# Altium PCB FG23_diff_PA_match_PCB.PcbDoc (part 1 of 2)
Units mil, origin at the board's own origin, x right, y up, seen from the top; angles counter-clockwise.
Board outline 1181.1 x 1771.65 mil, 4 copper layers (Top Layer, Signal Layer 2, Signal Layer 3, Bottom Layer), stack 62.992 mil thick; 85 components, 79 nets, 311 pads, 463 vias.
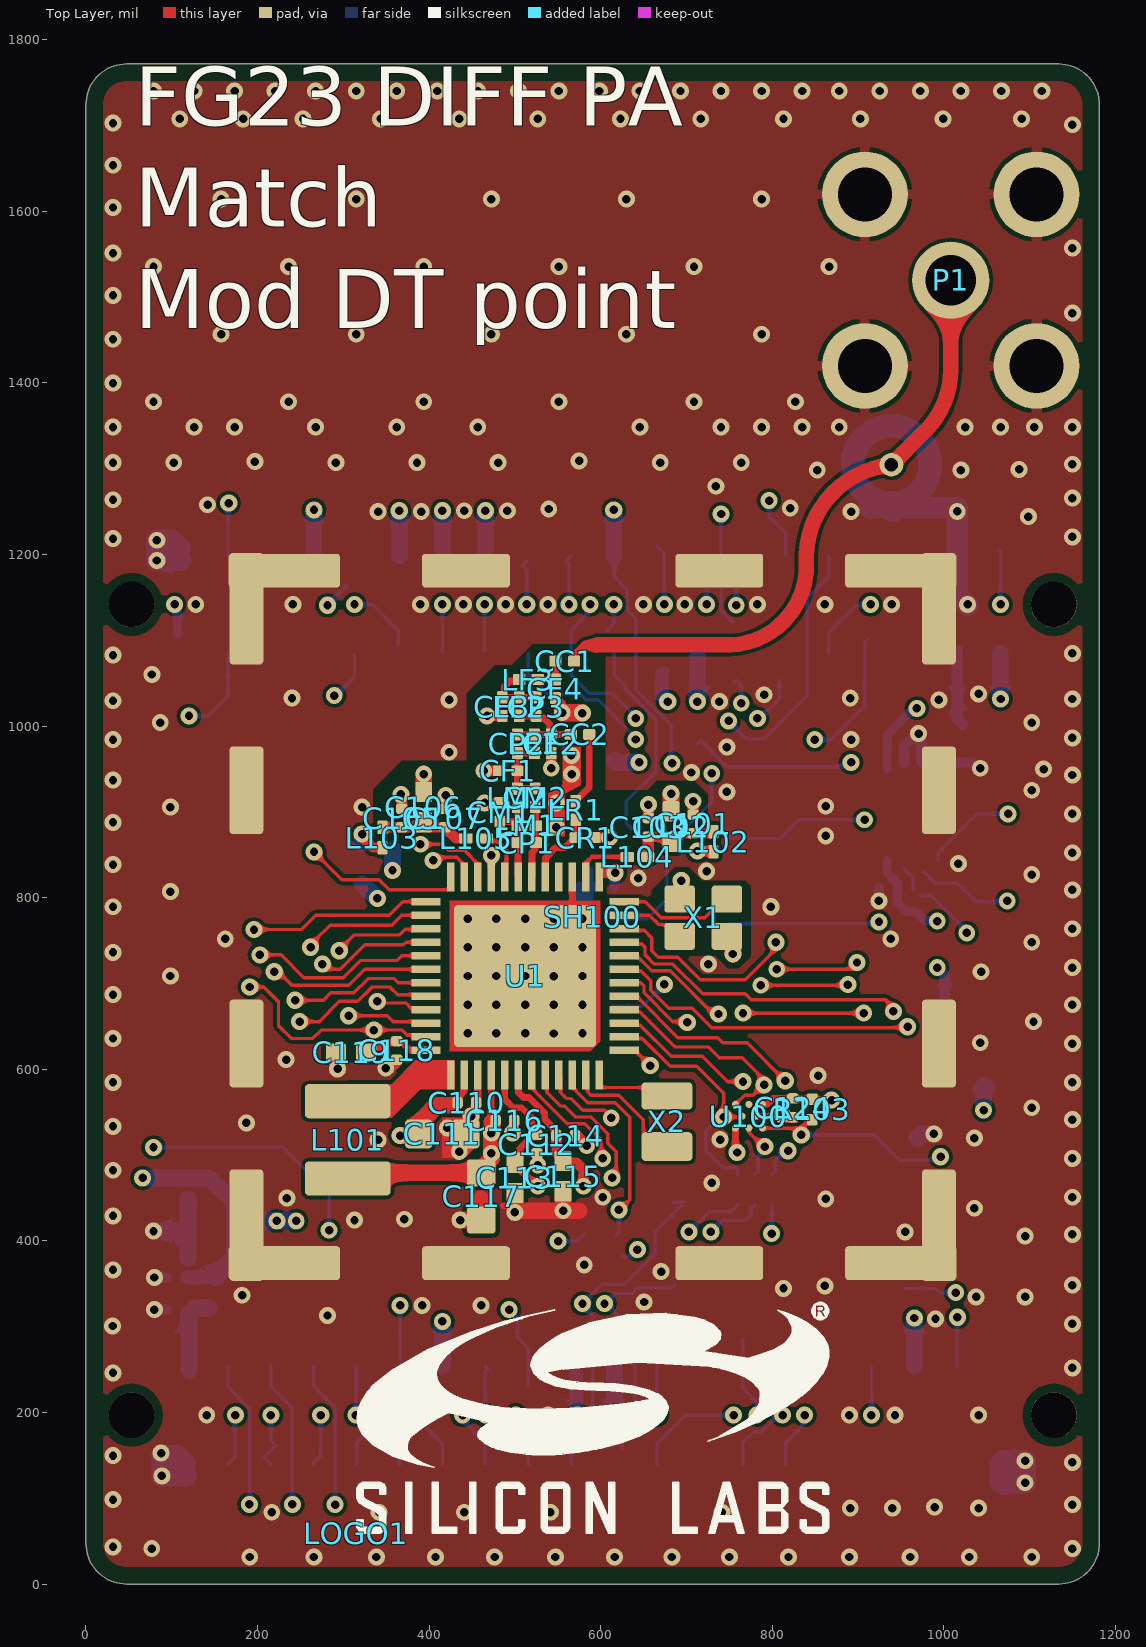
[diagram p0: Top Layer view]
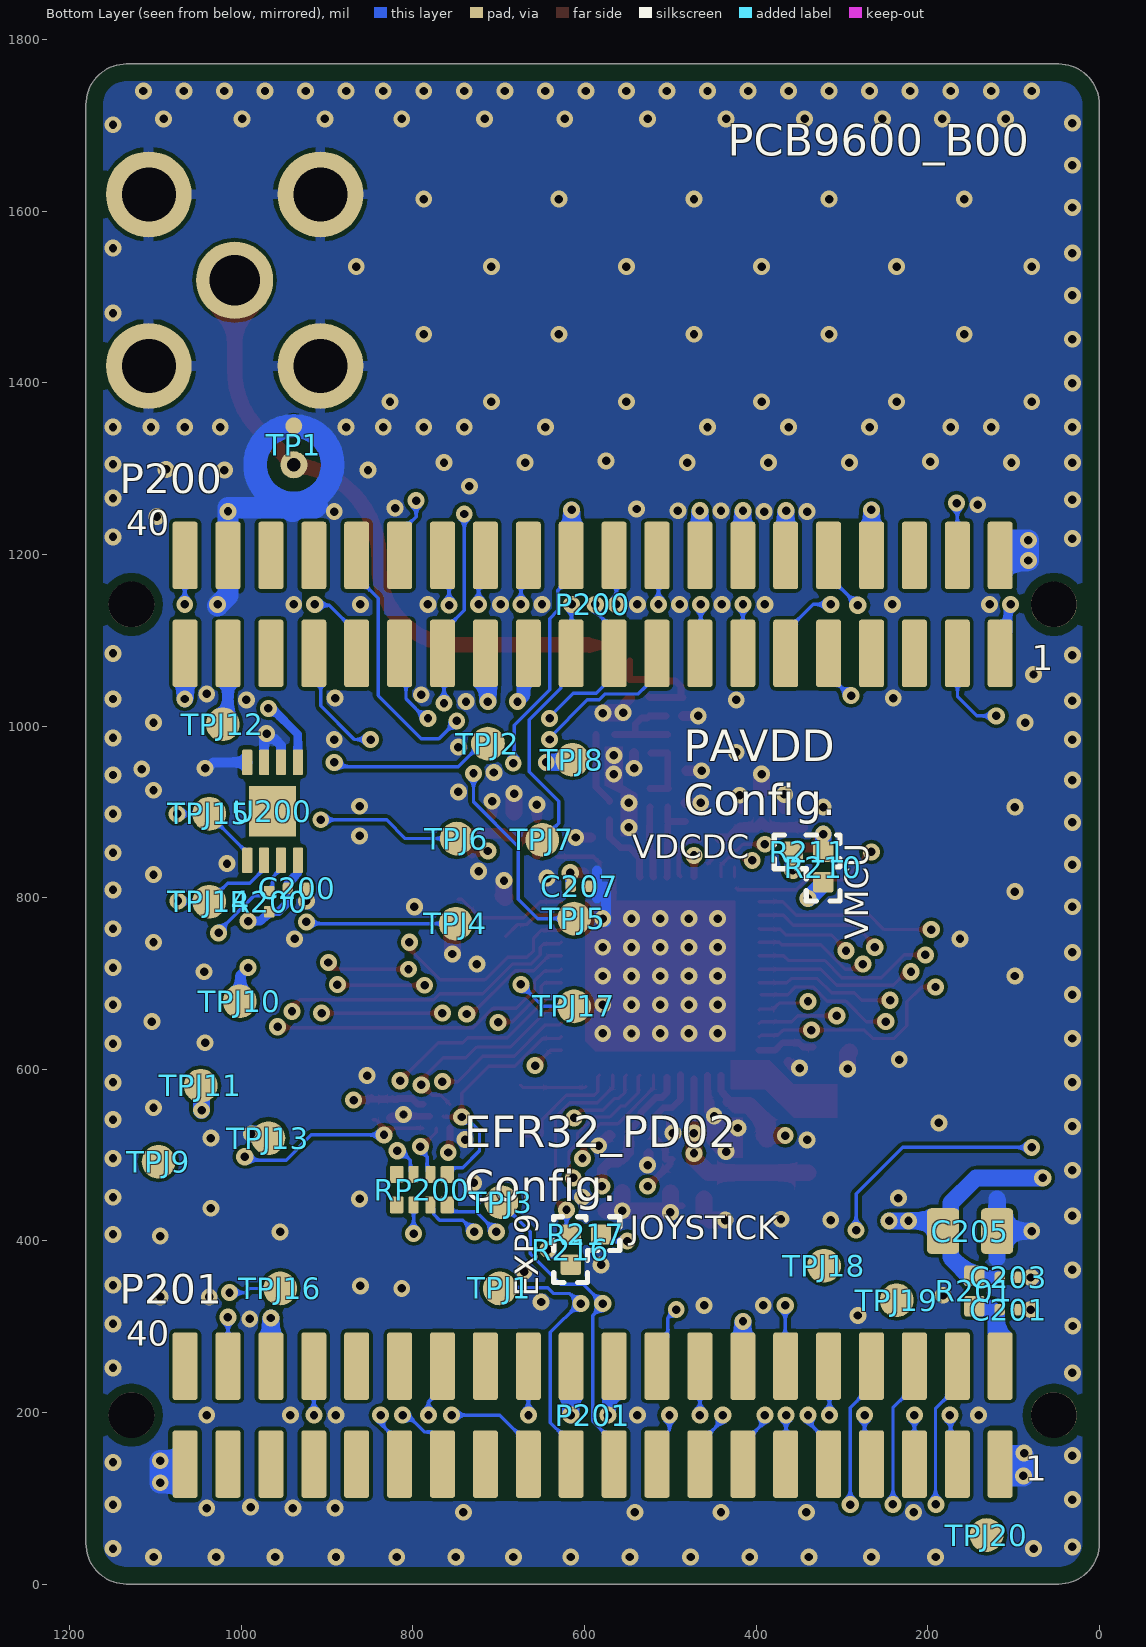
[diagram p1: Bottom Layer view, seen from below]
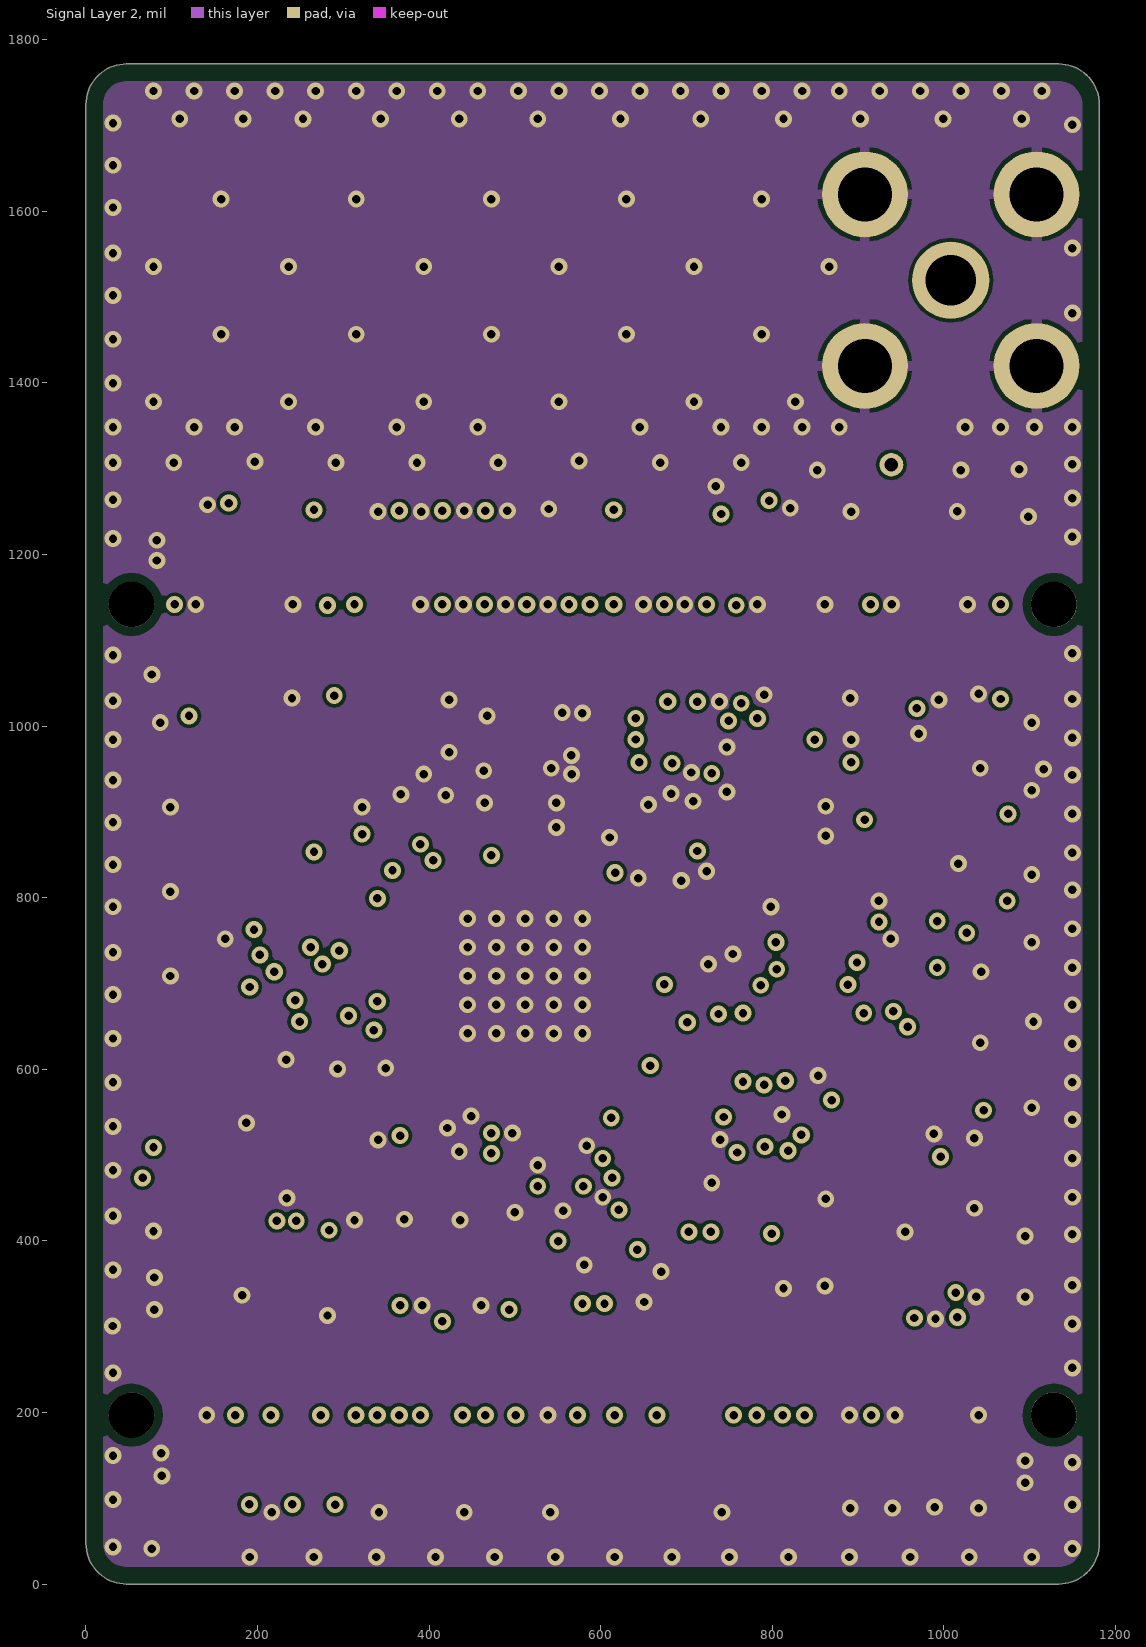
[diagram p2: Signal Layer 2]
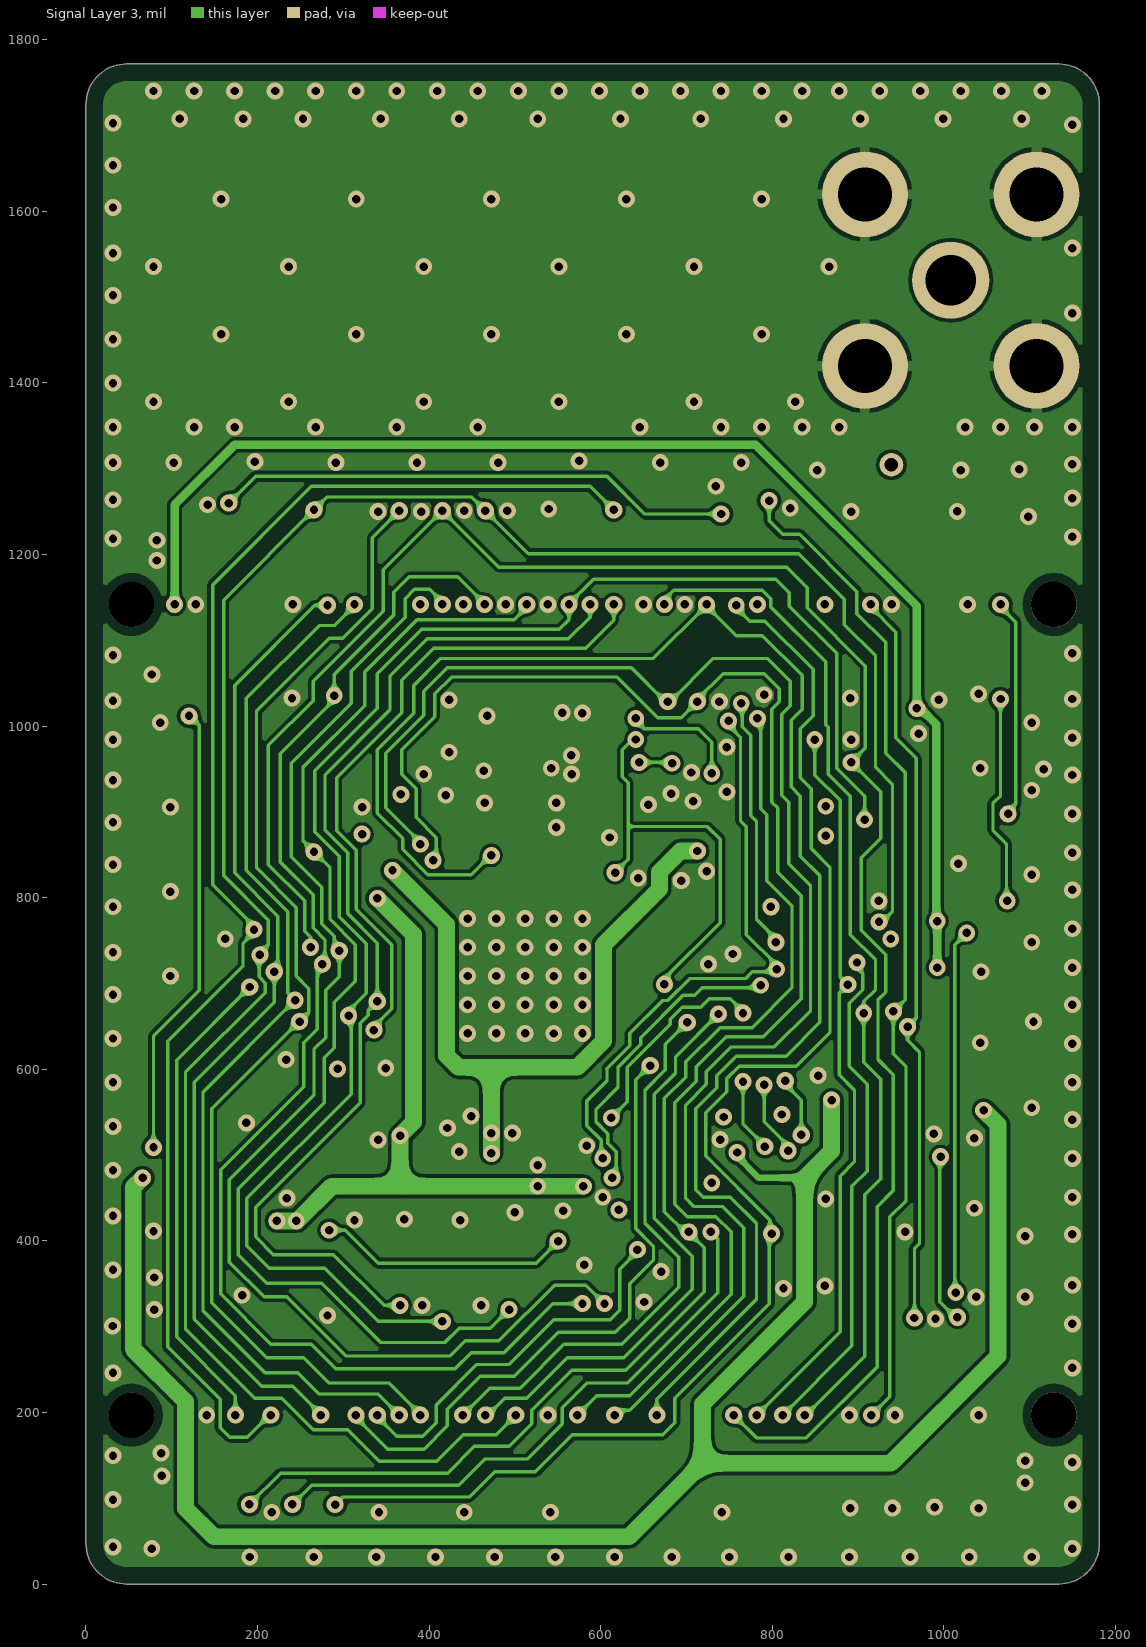
[diagram p3: Signal Layer 3]

## Layer stack, top to bottom
Top Solder: solder mask 0.4, Solder Resist, Dk 3.5
Top Layer: signal copper 1.378
Dielectric 1: core 12.7953, FR-4, Dk 4.2
Signal Layer 2: signal copper 0.7087
Dielectric 3: prepreg 33.2283, Dk 4.2
Signal Layer 3: signal copper 0.7087
Dielectric 2: core 12.7953, Dk 4.2
Bottom Layer: signal copper 1.378
Bottom Solder: solder mask 0.4, Solder Resist, Dk 3.5

## Board outline
0,47.24 0,1724.41 cw(c47.24,1724.41) 47.24,1771.65 1133.86,1771.65 cw(c1133.86,1724.41) 1181.1,1724.41 1181.1,47.24 cw(c1133.86,47.24) 1133.86,0 47.24,0 cw(c47.24,47.24)

## Design rules (kind name [scope] priority, off if disabled: settings)
AcuteAngle [All] p1: minimum=7.00000000000000E+0001 checktracksonly=FALSE
BoardOutlineClearance [All] p1: gap=19.68 ignorepadtopadclearanceinfootprint=FALSE
Clearance Clearance_50Ohm [InNet('50R*') vs InNet('GND')] p1: gap=10 ignorepadtopadclearanceinfootprint=FALSE except(0: Arc-Hole Track-Hole SMDPad-Hole THPad-Hole Via-Hole Fill-Hole Poly-Hole Region-Hole Text-Hole; 5.91: Track-SMDPad; 7.87: SMDPad-SMDPad)
Clearance Clearance_to_Holes [InPadClass('NPTH')] p2: gap=10 ignorepadtopadclearanceinfootprint=FALSE except(0: Arc-Hole Track-Hole SMDPad-Hole THPad-Hole Via-Hole Fill-Hole Poly-Hole Region-Hole Text-Hole)
Clearance Clerance_Polygon [InPolygon] p3: gap=3.94 ignorepadtopadclearanceinfootprint=FALSE except(0: Arc-Hole Track-Hole SMDPad-Hole THPad-Hole Via-Hole Fill-Hole Poly-Hole Region-Hole Text-Hole)
Clearance Clearance_General [All] p4: gap=3.94 ignorepadtopadclearanceinfootprint=FALSE except(0: Arc-Hole Track-Hole SMDPad-Hole THPad-Hole Via-Hole Fill-Hole Poly-Hole Region-Hole Text-Hole)
HoleToHoleClearance HoleToHoleClearance_ANT1toPAD [Incomponent ('ANT1') vs ISpad] p1: gap=0 allowstackedmicrovias=TRUE
HoleToHoleClearance HoleToHoleClearance_R1toR2_1 [Incomponent ('R1') vs Incomponent ('R2')] p2: gap=0 allowstackedmicrovias=TRUE
HoleToHoleClearance HoleToHoleClearance_U1toVIA_1 [InComponent ('U1') vs IsVia] p3: gap=0 allowstackedmicrovias=TRUE
HoleToHoleClearance [All] p4: gap=10 allowstackedmicrovias=TRUE
MinimumSolderMaskSliver [All] p1: minsoldermaskwidth=2.95
PolygonConnect Polygon_VIA_Connect [IsVia] p1: connectstyle=Direct reliefconductorwidth=10 reliefentries=4 polygonreliefangle="90 Angle" airgapwidth=10
PolygonConnect PolygonConnect_SH100 [InComponent('SH100')] p2: connectstyle=Direct reliefconductorwidth=10 reliefentries=4 polygonreliefangle="90 Angle" airgapwidth=5
PolygonConnect PolygonConnect_P1 [InComponent('P1')] p3: connectstyle=Relief reliefconductorwidth=11.81 reliefentries=4 polygonreliefangle="90 Angle" airgapwidth=5
PolygonConnect [All] p4: connectstyle=NoConnect reliefconductorwidth=7.87 reliefentries=4 polygonreliefangle="90 Angle" airgapwidth=4.92
RoutingVias [All] p1: holewidth=11.81 width=25.59 viastyle="Through Hole" minholewidth=9.84 minwidth=19.68 maxholewidth=39.37 maxwidth=59.06
ShortCircuit ShortCircuit_ANTtoPAD [InNet('NetAT1_1') vs InNet('GND')] p1: allowed=TRUE
ShortCircuit ShortCircuit_R1toR2_1 [Incomponent ('R1') vs Incomponent ('R2')] p2: allowed=TRUE
ShortCircuit [All] p3: allowed=FALSE
SilkToSilkClearance [All] p1: silktosilkclearance=4
SilkToSolderMaskClearance [IsPad] p1: minsilkscreentomaskgap=4 clearancetoexposedcopper=TRUE
SolderMaskExpansion [All] p1: expansion=2 istentingtop=FALSE
Width 50ohm [InNet('50R*')] p1: maxlimit=18 minlimit=4.88 preferedwidth=18
Width [All] p2: maxlimit=200 minlimit=3.94 preferedwidth=4.92
25 further rules are at their usual default settings.

## Classes and differential pairs
net class EFR32_PD0[5..0]: EFR32_PD00 EFR32_PD01 EFR32_PD02 EFR32_PD03 EFR32_PD04 EFR32_PD05
net class EFR32_PC0[9..0]: DISP_ENABLE DISP_EXTCOMIN DISP_SCS EFR32_PC00 EFR32_PC01 EFR32_PC02 EFR32_PC03 EFR32_PC04 EFR32_PC05 EFR32_PC07
net class EFR32_PB0[3..0]: EFR32_PB00 EFR32_PB01 EFR32_PB02 EFR32_PB03
net class WSTK_P[45..0]: DBG_SWCLK DBG_SWDIOTMS "DBG_SWO / DBG_TDO" DBG_TDI DEBUG_TRACED1 DEBUG_TRACED2 DEBUG_TRACED3 DISP_ENABLE DISP_EXTCOMIN DISP_SCLK DISP_SCS DISP_SI EFR32_PA00 EFR32_PA08 EFR32_PA09 EFR32_PA10 EFR32_PB00 EFR32_PB01 EFR32_PB02 EFR32_PB03 EFR32_PC00 EFR32_PC04 EFR32_PC05 EFR32_PC07 EFR32_PD03 EFR32_PD04 EFR32_PD05 EXP_HEADER6 EXP_HEADER9 JOYSTICK WSTK_P22 WSTK_P23 WSTK_P27 WSTK_P28 WSTK_P29 WSTK_P30 WSTK_P32 WSTK_P34 WSTK_P38 WSTK_P39 WSTK_P40
net class WSTK_F[21..0]: DBG_RESET DBG_SWCLK DBG_SWDIOTMS "DBG_SWO / DBG_TDO" DBG_TDI DISP_ENABLE DISP_EXTCOMIN DISP_SCLK DISP_SCS DISP_SI EFR32_PA00 EFR32_PA08 EFR32_PA09 EFR32_PA10 EFR32_PB00 EFR32_PB01 EFR32_PB02 EFR32_PB03 EFR32_PD03 EFR32_PD04 EFR32_PD05 WSTK_F21
net class EFR32_PA[10..0]: EFR32_PA10
component class "04_ WSTK Connectors & Board": C200 C201 C203 C205 P200 P201 R200 R201 TPJ1 TPJ2 TPJ3 TPJ4 TPJ5 TPJ6 TPJ7 TPJ8 TPJ9 TPJ10 TPJ11 TPJ12 TPJ13 TPJ14 TPJ15 TPJ16 TPJ17 TPJ18 TPJ19 TPJ20 U200
component class "03_ EFR32 Signal Assign": C124 C207 R103 R216 R217 RP200 U1 U100 X2
component class "02_ RF & Power": C101 C102 C103 C105 C106 C107 C110 C111 C112 C113 C114 C115 C116 C117 C118 C119 CC1 CC2 CF1 CF2 CF3 CF4 CH3 CM1 CM2 CP1 CP2 CP3 CR1 L101 L102 L103 L104 L105 LF1 LF2 LF3 LM1 LM2 LR1 P1 R210 R211 SH100 SH101 TP1 X1
component class "01_ Title Page": PCB1
pad class NPTH: P200-M1 P200-M2 P201-M1 P201-M2

## Components (designator, comment, footprint, x,y, rotation, side; value= is the part's Value field where it differs from the comment)
C101 "TBD" C0201_L 707.68,885.83 r90 top
C102 "1U" C0402_L 682.09,882.87 r90 top
C103 "100P" C0201_L 655.51,881.89 r90 top
C105 "TBD" C0201_L 368.11,892.72 r90 top
C106 "470N" C0402_L 393.7,905.51 r90 top
C107 "100P" C0201_L 418.31,892.72 r90 top
C110 "100N" C0201_L 443.9,561.02 r0 top
C111 "10U" C0603_L 415.35,524.61 r0 top
C112 "10N" C0201_L 525.59,512.8 r270 top
C113 "1U" C0402_L 500,473.43 r270 top
C114 "100N" C0201_L 559.06,522.64 r0 top
C115 "1U" C0402_L 556.1,475.39 r270 top
C116 "100N" C0201_L 488.19,540.35 r0 top
C117 "4U7" C0603_L 460.63,451.77 r270 top
C118 "100N" C0201_L 362.2,622.05 r270 top
C119 "1U" C0402_L 309.06,620.08 r180 top
C124 "100N" C0201_L 823.82,555.12 r270 top
C200 "100N" C0201_L 935.04,811.02 r180 bottom
C201 "100N" C0201_L 105.31,319.88 r180 bottom
C203 "100N" C0201_L 105.31,357.29 r180 bottom
C205 "10U" C0805_L 150.59,411.42 r180 bottom
C207 "100N" C0201_L 605.31,812.99 r180 bottom
CC1 "" C0201_GM 558.07,1075.79 r0 top
CC2 "" C0201_GM 575.79,990.16 r180 top
CF1 "" C0201_GM 492.13,947.83 r0 top
CF2 "" C0201_GM 542.32,979.33 r90 top
CF3 "" C0201_GM 485.24,1022.64 r90 top
CF4 "" C0201_GM 547.24,1043.31 r90 top
CM1 "" C0201_GM 482.28,899.61 r270 top
CM2 "" C0201_GM 523.62,916.34 r90 top
CP1 "" C0201_GM 513.78,864.17 r0 top
CP2 "" C0201_GM 502.95,979.33 r90 top
CP3 "" C0201_GM 524.61,1022.64 r90 top
CR1 "" C0201_GM 581.69,870.08 r180 top
Designator39 "Comment" PCB_SPEC_4_LAYER -2704.72,4259.84 r0 top
L101 "2U2" COIL_1008_L 305.12,517.72 r270 top
L102 "BLM03AG700SN1D" COIL_MUR_BLM03_0201 731.3,865.16 r90 top
L103 "0R" COIL_MUR_BLM03_0201 345.47,870.08 r90 top
L104 "0R" COIL_MUR_BLM03_0201 642.72,847.44 r180 top
L105 "BLM03PG330SN1D" COIL_MUR_BLM03_0201 454.72,869.09 r0 top
LF1 "LQP03HQ3N6B02" COIL_0201_GM 522.64,979.33 r90 top
LF2 "LQP03HQ3N6B02" COIL_0201_GM 504.92,1022.64 r90 top
LF3 "LQP03HQ3N6B02" COIL_0201_GM 515.75,1054.13 r0 top
LM1 "LQP03HQ3N6B02" COIL_0201_GM 513.78,883.86 r0 top
LM2 "LQP03HQ3N6B02" COIL_0201_GM 502.95,916.34 r90 top
LOGO1 "Comment" LOGO_SILABS_W14.0 314.96,59.06 r0 top
LR1 "LQP03HQ3N6B02" COIL_0201_GM 570.87,901.57 r90 top
P1 "SMA" TE_SMA_1814832_TH_VER 1007.87,1519.68 r0 top locked
P200 "SOCKET_WCON_2X20_1.27MM_SMD" SAM_SFC-120-T2-D-A-2X20_SNUM 590.55,1141.73 r0 bottom locked
P201 "SOCKET_WCON_2X20_1.27MM_SMD" SAM_SFC-120-T2-D-A-2X20_SNUM 590.55,196.85 r0 bottom locked
R103 "330K" R0201_L 846.46,553.15 r90 top
R200 "10K" R0201_L 967.52,795.28 r270 bottom
R201 "0R" R0402_L 145.67,341.54 r90 bottom
R210 "0R" R0402_L 321.85,835.63 r270 bottom
R211 "0R" R0402_L 339.57,853.35 r180 bottom
R216 "0R" R0402_L 616.14,389.77 r270 bottom
R217 "0R" R0402_L 598.43,407.48 r180 bottom
RP200 "100R" RES_MNR04-8 789.37,459.65 r0 bottom
SH100 "RF_SHIELD_FRAME_36103205S" shield_21x21mm 590.55,777.56 r180 top locked
TP1 "TP_RF" "TP_INGUN_50_OHM_CLOSED OPENVIA" 938.78,1304.53 r0 bottom
TPJ1 "TPJ_SMD" TP_1.0_SMD 698.82,344.49 r90 bottom locked
TPJ2 "TPJ_SMD" TP_1.0_SMD 712.6,979.53 r90 bottom locked
TPJ3 "TPJ_SMD" TP_1.0_SMD 696.85,444.88 r90 bottom locked
TPJ4 "TPJ_SMD" TP_1.0_SMD 750,769.69 r90 bottom locked
TPJ5 "TPJ_SMD" TP_1.0_SMD 612.2,775.59 r90 bottom locked
TPJ6 "TPJ_SMD" TP_1.0_SMD 748.82,868.9 r90 bottom locked
TPJ7 "TPJ_SMD" TP_1.0_SMD 649.21,867.32 r90 bottom locked
TPJ8 "TPJ_SMD" TP_1.0_SMD 614.17,960.63 r90 bottom locked
TPJ9 "TPJ_SMD" TP_1.0_SMD 1096.46,492.13 r90 bottom locked
TPJ10 "TPJ_SMD" TP_1.0_SMD 1001.97,679.13 r90 bottom locked
TPJ11 "TPJ_SMD" TP_1.0_SMD 1047.24,580.71 r90 bottom locked
TPJ12 "TPJ_SMD" TP_1.0_SMD 1021.65,1001.97 r90 bottom locked
TPJ13 "TPJ_SMD" TP_1.0_SMD 968.5,519.69 r90 bottom locked
TPJ14 "TPJ_SMD" TP_1.0_SMD 1037.4,795.28 r90 bottom locked
TPJ15 "TPJ_SMD" TP_1.0_SMD 1037.4,897.64 r90 bottom locked
TPJ16 "TPJ_SMD" TP_1.0_SMD 954.72,344.49 r90 bottom locked
TPJ17 "TPJ_SMD" TP_1.0_SMD 612.2,673.23 r90 bottom locked
TPJ18 "TPJ_SMD" TP_1.0_SMD 320.87,370.87 r90 bottom locked
TPJ19 "TPJ_SMD" TP_1.0_SMD 236.22,330.71 r90 bottom locked
TPJ20 "TPJ_SMD" TP_1.0_SMD 131.5,57.09 r90 bottom locked
U1 "EFR32xG23-QFN48" QFN48_M040_6.0X6.0_EP_SL 511.81,708.66 r180 top
U100 "MX25R8035F" BGA8_M040_1.24X1.75_WLCSP 772.64,545.28 r270 top
U200 "M24C02" TDFN8_M050_2.0X3.0_EP 963.58,900.59 r270 bottom
X1 "39MHz" KDS_DSX211SH_2016 719.49,776.57 r180 top
X2 "32.768kHz" X_MCS_CM8V-T1A 677.17,539.37 r270 top

## Footprints (in the part's own frame and the unit in brackets; to place one, negate y for a bottom-side part, rotate by r counter-clockwise, add the part's x,y. Pads: shape width x height; smd on the part's side, far side on the other; paste and mask are expansions set on the pad)
BGA8_M040_1.24X1.75_WLCSP [mm] "BGA, 8 pin. U100"
  round 0.21 smd mask+0.038: A1(-0.35,0.4) A3(0.35,0.4) B2(0,0.2) C1(-0.35,0) C3(0.35,0) D2(0,-0.2) E1(-0.35,-0.4) E3(0.35,-0.4)
  body extent -0.63,-0.89 0.63,0.88, height 0.52
C0201_GM [mm] "Capacitor, 9291, HiDens (170502), GANG Mask added as SM web width is less than 0.1mm"
  rrect25% 0.36x0.32 smd paste-0.015: 1(-0.275,0) 2(0.275,0)
  Top Layer pour cut-out: -0.075,-0.2 -0.075,0.2 0.075,0.2 0.075,-0.2
C0201_L [mm] "Capacitor, Chip; 0.60 mm L X 0.30 mm W X 0.33 mm H body"
  rrect52% 0.31x0.34 smd: 1(-0.275,0) 2(0.275,0)
  body extent -0.3,-0.15 0.3,0.15, height 0.3
C0402_L [mm] "Chip Capacitor, 2-Leads, Body 1.0x0.5mm, IPC High Density"
  rrect20% 0.6x0.5 smd mask+0.051: 1(-0.45,0) 2(0.45,0)
  body extent -0.5,-0.25 0.5,0.25, height 0.6
C0603_L [mm] "Capacitor, 0603, High Density (C)"
  rrect25% 0.8x0.85 smd: 1(-0.7,0) 2(0.7,0)
  body extent -0.8,-0.4 0.8,0.4, height 0.95
C0805_L [mm] "Capacitor, 0805"
  rrect25% 0.95x1.35 smd: 1(-0.8,0) 2(0.8,0)
  body extent -1.1,-0.72 1.1,0.72, height 1.45
COIL_0201_GM [mm] "Inductor, 0201, High Density (C), Gang soldermask added"
  rrect10% 0.37x0.32 smd: 1(-0.27,0) 2(0.27,0)
COIL_1008_L [mil] "Chip Inductors, 1008 (2520), Coilcraft (190207)"
  rrect25% 40x100 smd: 1(-45,0) 2(45,0)
  body extent -58,-55 57,55, height 80
COIL_MUR_BLM03_0201 [mm] "COIL_MUR_BLM03_0201"
  rrect25% 0.4x0.3 smd mask+0.051: 1(-0.3,0) 2(0.3,0)
  body extent -0.3,-0.15 0.3,0.15, height 0.95
KDS_DSX211SH_2016 [mm] "Copy of Silabs CE  X_KDS_DSX211SH_2.0X1.65-4"
  rrect20% 0.9x0.8 smd mask+0.051: 1(-0.7,-0.55) 2(0.7,-0.55) 3(0.7,0.55) 4(-0.7,0.55)
  body extent -1.07,-0.87 1.08,0.88, height 0.5
LOGO_SILABS_W14.0 [mil] "LOGO_SILABS_W14.0"
  silkscreen extent 1,0 551,269
PCB_SPEC_4_LAYER [mil]
QFN48_M040_6.0X6.0_EP_SL [mm]
  rrect5% 4.2x4.2 smd paste-4.2 mask-4.2: 0(0,0)
  rect 0.86x0.22 smd paste+0 mask+0.06: 1(-2.935,2.2) 2(-2.935,1.8) 3(-2.935,1.4) 4(-2.935,1) 5(-2.935,0.6) 6(-2.935,0.2) 7(-2.935,-0.2) 8(-2.935,-0.6) 9(-2.935,-1) 10(-2.935,-1.4) 11(-2.935,-1.8) 12(-2.935,-2.2) 25(2.935,-2.2) 26(2.935,-1.8) 27(2.935,-1.4) 28(2.935,-1) 29(2.935,-0.6) 30(2.935,-0.2) 31(2.935,0.2) 32(2.935,0.6) 33(2.935,1) 34(2.935,1.4) 35(2.935,1.8) 36(2.935,2.2)
  rect 0.22x0.86 smd paste+0 mask+0.06: 13(-2.2,-2.935) 14(-1.8,-2.935) 15(-1.4,-2.935) 16(-1,-2.935) 17(-0.6,-2.935) 18(-0.2,-2.935) 19(0.2,-2.935) 20(0.6,-2.935) 21(1,-2.935) 22(1.4,-2.935) 23(1.8,-2.935) 24(2.2,-2.935) 37(2.2,2.935) 38(1.8,2.935) 39(1.4,2.935) 40(1,2.935) 41(0.6,2.935) 42(0.2,2.935) 43(-0.2,2.935) 44(-0.6,2.935) 45(-1,2.935) 46(-1.4,2.935) 47(-1.8,2.935) 48(-2.2,2.935)
  Top Layer pour cut-out: -2.505,-2.31 -2.31,-2.505 2.31,-2.505 2.505,-2.31 2.505,2.309 2.309,2.505 -2.31,2.505 -2.505,2.309
  Top Layer region: 2.225,-2.225 -2.225,-2.225 -2.225,1.925 -1.925,2.225 2.225,2.225
  body extent -3,-3 3,3, height 0.86
R0201_L [mm] "Resistor (Chip2PinSM127P600-8N) (170921)"
  rrect25% 0.34x0.32 smd: 1(-0.3,0) 2(0.3,0)
  body extent -0.32,-0.13 0.32,0.13, height 0.3
R0402_L [mm] "Chip Resistor, 2-Leads, Body 1.0x0.5mm, IPC High Density"
  rrect20% 0.6x0.6 smd mask+0.051: 1(-0.45,0) 2(0.45,0)
  body extent -0.5,-0.25 0.5,0.25, height 0.6
RES_MNR04-8 [mm] "Chip resistor network 8pin"
  rrect20% 0.4x0.5 smd mask+0.051: 1(-0.75,-0.45) 4(0.75,-0.45) 5(0.75,0.45) 8(-0.75,0.45)
  rrect20% 0.3x0.5 smd mask+0.051: 2(-0.25,-0.45) 3(0.25,-0.45) 6(0.25,0.45) 7(-0.25,0.45)
  body extent -1,-0.4 1,0.4, height 0.5
SAM_SFC-120-T2-D-A-2X20_SNUM [mm]
  rrect20% 0.74x2 smd mask+0.05: 1(-12.065,1.45) 2(-12.065,-1.45) 3(-10.795,1.45) 4(-10.795,-1.45) 5(-9.525,1.45) 6(-9.525,-1.45) 7(-8.255,1.45) 8(-8.255,-1.45) 9(-6.985,1.45) 10(-6.985,-1.45) 11(-5.715,1.45) 12(-5.715,-1.45) 13(-4.445,1.45) 14(-4.445,-1.45) 15(-3.175,1.45) 16(-3.175,-1.45) 17(-1.905,1.45) 18(-1.905,-1.45) 19(-0.635,1.45) 20(-0.635,-1.45) 21(0.635,1.45) 22(0.635,-1.45) 23(1.905,1.45) 24(1.905,-1.45) 25(3.175,1.45) 26(3.175,-1.45) 27(4.445,1.45) 28(4.445,-1.45) 29(5.715,1.45) 30(5.715,-1.45) 31(6.985,1.45) 32(6.985,-1.45) 33(8.255,1.45) 34(8.255,-1.45) 35(9.525,1.45) 36(9.525,-1.45) 37(10.795,1.45) 38(10.795,-1.45) 39(12.065,1.45) 40(12.065,-1.45)
  round 1.35 hole 1.35 unplated paste-2539.97 mask-5.563: M1(13.652,0) M2(-13.652,0)
  body extent -14.29,-2.1 14.29,2.16, height 4.67
shield_21x21mm [mm]
  rrect20% 1x3.3 smd paste+0 mask+0.05: 1(-10.25,9.125) 1(-10.25,-9.125) 1(10.25,9.125) 1(10.25,-9.125)
  rrect20% 1x2.6 smd paste+0 mask+0.05: 1(-10.25,-3.75) 1(-10.25,3.75) 1(10.25,-3.75) 1(10.25,3.75)
  rrect20% 3.3x1 smd paste+0 mask+0.05: 1(-9.125,10.25) 1(-9.125,-10.25) 1(9.125,10.25) 1(9.125,-10.25)
  rrect20% 2.6x1 smd paste+0 mask+0.05: 1(-3.75,10.25) 1(-3.75,-10.25) 1(3.75,10.25) 1(3.75,-10.25)
  body extent -13,-13 12.99,12.99, height 5.08
TDFN8_M050_2.0X3.0_EP [mm] "TDFN8_M050_2.0x3.0_EP"
  rrect20% 0.75x0.3 smd mask+0.051: 1(-1.45,0.75) 2(-1.45,0.25) 3(-1.45,-0.25) 4(-1.45,-0.75) 5(1.45,-0.75) 6(1.45,-0.25) 7(1.45,0.25) 8(1.45,0.75)
  rect 1.5x1.4 smd mask+0.051: 9(0,0)
  body extent -1.5,-1 1.5,1, height 1.01
TE_SMA_1814832_TH_VER [mm]
  round 2.286 hole 1.5: 1(0,0)
  round 2.54 hole 1.6: 2(-2.54,-2.54) 3(2.54,-2.54) 4(2.54,2.54) 5(-2.54,2.54)
  body extent -3.2,-3.2 3.2,3.2, height 9.5
TP_1.0_SMD [mm] "Test Point, 1.0 mm, SMD"
  round 1 smd paste-0.501: 1(0,0)
  body extent -0.2,-0.2 0.2,0.2, height 0.01
"TP_INGUN_50_OHM_CLOSED OPENVIA" [mm] "TP_INGUN_50_OHM_CLOSED"
  round 0.8 / inner round 0.7 / far side round 0.7 hole 0.4 mask+0: 1(0,0)
  round 0.5 smd paste-0.255 mask-0.41: 2(0,-1.15)
  Top Layer pour cut-out: 0,-0.8 0.4,-0.693 0.693,-0.4 0.8,0 0.693,0.4 0.4,0.693 0,0.8 0,0.8 -0.347,0.721 -0.625,0.499 -0.78,0.178 -0.78,-0.178 -0.625,-0.499 -0.347,-0.721 0,-0.8
  Top Layer lines w0.7: -1.15,0 cw(c0,0) 0,-1.15 cw(c0,0) -1.15,0
X_MCS_CM8V-T1A [mm] "Crystal MCS CM8V-T1A (2 pin)"
  rrect25% 0.8x1.5 smd mask+0.051: 1(-0.75,0)
  rrect25% 0.85x1.5 smd mask+0.051: 2(0.75,0)
  body extent -1,-0.6 1,0.6, height 0.95

## Part data
C101 C105: library part C0201, Rating=50V, Tolerance=+/-0.05P, Not Mounted=NM, Technology=C0G
C102 C113 C115 C119: library part C0402, Rating=6.3V, Tolerance=10%, Technology=X7R
C103 C107: library part C0201, Rating=25V, Tolerance=5%, Technology=C0G
C106: library part C0402, Rating=10V, Tolerance=10%, Technology=X7R
C110 C114 C116 C118 C124 C200 C201 C203 C207: library part C0201, Rating=16V, Tolerance=20%, Technology=X7S
C111: library part C0603, Rating=25V, Tolerance=10%, Technology=X5R
C112: library part C0201, Rating=16V, Tolerance=10%, Technology=X7S
C117: library part C0603, Rating=6.3V, Tolerance=10%, Technology=X7R
C205: library part CAPACITOR, Not Mounted=NM, Technology=X5R
CC1 CC2 CF1 CF2 CF3 CF4 CM1 CM2 CP1 CP2 CP3 CR1: library part CMP-120-00593-A.01, "CAP CER 0201 C0G 7.1pF 50V ±0.1pF", Manufacturer=Murata, Manufacturer PN=GJM0335C1H7R1BB01, Max Operating Temp=125°C, Min Operating Temp=-55°C, Package=0201, Rating=50V, Tolerance=0.1pF, Material=C0G, Mount=SMD, RoHS=Compliant, SubCategory Tag=Ceramic
L101: library part L1008, Tolerance=+/-20%, Mfg=Murata, Mfg #=DFE2HCAH2R2MJ0L
L102 L103 L104 L105: library part BLM03AX, Price_1K=0.05
  L102: Mfg=Murata, Mfg #=BLM03AG700SN1D
  L105: Mfg=Murata, Mfg #=BLM03PG330SN1D
LF1 LF2 LF3 LM1 LM2 LR1: library part CMP-155-00127-A.01, "IND Fixed 0201 3.6nH 500mA 170mOhm ±0.1nH", DC Resistance=0.17, Manufacturer=Murata, Max Operating Temp=125°C, Min Operating Temp=-55°C, Package=0201, Rating=500mA, Tolerance=0.1nH, Manufacturer PN=LQP03HQ3N6B02, Mount=SMD, RoHS=Compliant, Shielding="Not shielded", SubCategory Tag=Fixed
P1: library part SMA_TH_WELLSHOW, Mfg=Wellshow, Mfg #=C02AN31P00101, Price_1K=1.46
R103 R200: library part R0201, Price_1K=0.005
R201: library part RESISTOR, Price_1K=0.005
R210 R211 R216 R217: library part R0402, Price_1K=0.005
  R210 R217: Not Mounted=NM
RP200: library part MNR04M0APJ101, Mfg=ROHM, Mfg #=MNR04M0APJ101, Price_1K=0.0122
TPJ1 TPJ2 TPJ3 TPJ4 TPJ5 TPJ6 TPJ7 TPJ8 TPJ17: library part TPJ_SMD_Dup1
U1: library part EFR32xG23_QFN48, Mfg="Silicon Labs", Mfg #=EFR32xG23-QFN48
U100: library part MX25R8035, Mfg=Macronix, Mfg #=MX25R8035FBDIL0, Price_1K=0.25
X1: library part DSX211SH, Mfg=TBD, Mfg #=TBD, Price_1K=0.512
X2: library part CM8V-T1A, Mfg="Micro Crystal AG", Mfg #="CM8V-T1A, 32768Hz, 12.5pF, +/- 20ppm", Price_1K=0.3
P200 P201: Mfg=WCON, Mfg #=2344-220MS3CUNR6, Price_1K=3.44
SH100: Mfg="Würth Elektronik", Mfg #=36103205S, Not Mounted=NM, Price_1K=1.00
U200: CONTEC Footprint=MSOP8_M065_W3.0, Mfg="ST Microelectronics", Mfg #=M24C02-FMC6TG, Price_1K=0.06

## Via types
v1: diameter 19.68, hole 9.84, Top Layer to Bottom Layer, tented both sides, 383 vias
v2: diameter 20, hole 9.84, Top Layer to Bottom Layer, tented both sides, 80 vias

## Nets (pads, with @x,y where several pads share a name; then routed paths per layer and width w, separated by ;. In a path a pad name is that pad's centre, name@x,y a point inside that pad or via, vN(x,y) a via of type N, cw(c..) or ccw(c..) an arc to the next point about the centre after c; other vN are vias at no path point)
3V3: C200.1 P200.1 R200.2 TPJ10.1 U200.1 U200.8 | length 1810.1
  Signal Layer 3 w10: v1(103.35,1141.73) 103.35,1257.87 173.37,1327.9 780.37,1327.9 968.5,1139.76 v1(968.5,1020.67) 972.44,1020.67 991.22,1001.89 991.22,772.65 v1(992.13,772.65) v1(992.13,718.5) 991.14,718.5 v1@989.17,716.54
  Bottom Layer w10: v1(103.35,1141.73) 103.35,1143.7 101.87,1142.22 106.3,1137.8 106.3,1109.25 P200.1@108.27,1107.28 ; U200.8@934.06,843.5 934.06,828.74 945.87,816.93 C200.1@945.87,812.01 ; U200.1@934.06,949.8 934.06,990.24 964.49,1020.67 v1(968.5,1020.67) ; C200.1@945.87,811.02 945.87,794.29 956.69,783.46 R200.2@965.55,783.46 ; R200.2@967.52,782.87 977.74,772.65 v1(992.13,772.65)
  Bottom Layer w12: v1(992.13,718.5) 1000.98,709.65 TPJ10.1@1000.98,673.23
5V: P200.37 TPJ12.1 | length 88.6
  Bottom Layer w13: P200.37@1015.55,1087.99 P200.37@1015.55,1084.65 1015.55,1008.07 TPJ12.1@1021.65,1001.97
BOARD_ID_SCL: P200.39 TPJ14.1 U200.6 | length 411.4
  Signal Layer 3 w3.94: v1(1065.94,1031.5) 1065.94,918.92 1057.09,910.07 1057.09,878.57 1072.83,862.82 v1@1072.83,798.23
  Bottom Layer w3.94: U200.6@977.36,829.72 990.16,816.93 1015.75,816.93 TPJ14.1@1037.4,795.28 v1@1077.76,795.28
  Bottom Layer w19.68: P200.39@1065.55,1084.65 1065.55,1031.89 v1(1065.94,1031.5)
  other v1: 1073.82,796.26
BOARD_ID_SDA: P200.40 TPJ15.1 U200.5 | length 419.7
  Signal Layer 3 w3.94: v1@1065.94,1138.78 1083.69,1121.03 1083.69,909.48 v1@1074.8,900.59
  Bottom Layer w4: U200.5@993.11,843.5 993.11,852.36 1035.43,894.68 TPJ15.1@1036.42,894.68 ; TPJ15.1@1037.4,897.64 v1(1074.8,897.64) ; P200.40@1064.96,1204.72 1065.94,1203.74 v1(1065.94,1141.73)
BOARD_ID_WP: R200.1 TPJ16.1 U200.7 | length 583.7
  Signal Layer 3 w3.94: v1(1013.78,339.57) 1012.8,340.55 1012.8,745.08 v1(1026.57,758.86)
  Bottom Layer w3.94: U200.7@953.74,833.66 963.58,823.82 R200.1@963.58,809.06 ; TPJ16.1@954.72,344.49 990.16,344.49 995.08,339.57 v1(1013.78,339.57) ; R200.1@972.44,802.17 985.24,802.17 v1@1024.61,762.8
DBG_RESET: C207.1 P200.17 TPJ17.1 U1.13 | length 780.8
  Top Layer w3.94: v2@616.17,824.21 v2@619.68,824.21
  Top Layer w11.81: U1.13@600.68,829.03 v2(616.69,829.03)
  Signal Layer 3 w3.94: v2(616.69,829.03) 616.69,829.3 631.89,844.5 631.89,882.87 ; v1@640.75,988.19 625,972.44 625,940.94 631.89,934.06 631.89,882.87 ; v1(640.78,984.3) v1@640.78,988.16 ; v2(674.25,698.85) 674.25,705.74 739.33,770.83 739.33,867.95 724.41,882.87 631.89,882.87
  Bottom Layer w3.94: P200.17@515.55,1084.65 515.55,1059.25 515.63,1059.25 528.15,1046.73 528.15,1046.65 537.4,1037.4 575.79,1037.4 582.68,1030.51 596.88,1030.51 640.78,986.61 v1(640.78,984.3) ; TPJ17.1@612.2,673.23 648.62,673.23 v2(674.25,698.85)
  Bottom Layer w11.81: v2@615.16,829.72 616.14,828.74 C207.1@616.14,812.99
DBG_SWCLK: P200.14 P201.23 TPJ2.1 U1.26 | length 2812.1
  Top Layer w3.94: v2@266.81,750.07 284.75,768.02 356.6,768.02 368.11,779.53 U1.26@396.26,779.53
  Signal Layer 3 w3.94: v2(261.81,742.13) 261.81,753.94 254.92,760.83 254.92,796.26 212.6,838.58 212.6,977.36 264.76,1029.53 264.76,1052.17 346.46,1133.86 346.46,1182.09 v2(415.35,1250.98) 481.3,1185.04 816.62,1185.04 840.55,1161.11 840.55,1137.8 908.46,1069.88 908.46,974.41 v2(891.73,957.68) 926.18,923.23 926.18,869.09 903.54,846.46 903.54,761.81 932.09,733.27 932.09,689.96 923.12,680.99 923.12,611.33 940.94,593.5 940.94,458.66 922.24,439.96 922.24,252.95 839.57,170.28 781.5,170.28 v1(754.92,196.85)
  Bottom Layer w3.94: P201.23@665.55,139.76 665.55,163.58 698.82,196.85 v1(754.92,196.85) ; TPJ2.1@712.6,979.53 716.44,983.37 747.05,952.76 896.74,952.76 891.82,957.68 v2(891.73,957.68)
  Bottom Layer w19.68: v2(415.35,1250.98) 415.55,1250.79 P200.14@415.55,1198.82
DBG_SWDIOTMS: P200.13 P201.21 TPJ1.1 U1.27 | length 1952.1
  Top Layer w3.94: v2(295.28,738.19) v2@294.29,738.19 ; U1.27@396.26,763.78 395.47,762.99 372.05,762.99 365.57,756.51 312.62,756.51 v2@294.29,738.19 ; v2@294.29,738.19 292.81,736.71 291.34,738.19 v2@294.29,738.19
  Signal Layer 3 w3.94: v2@289.37,744.09 289.37,754.92 274.61,769.69 274.61,812.01 239.17,847.44 239.17,956.69 309.06,1026.57 309.06,1063.98 372.05,1126.97 372.05,1148.62 382.87,1159.45 400.59,1159.45 415.35,1144.69 v1(415.35,1141.73) ; v2(295.28,738.19) 295.28,707.68 279.53,691.93 279.53,636.81 265.75,623.03 265.75,569.88 167.13,471.26 167.13,375.2 207.68,334.65 234.25,334.65 303.15,265.75 424.21,265.75 441.93,283.46 481.3,283.46 546.26,348.43 582.68,348.43 v1(604.33,326.77) ; v1(604.33,326.77) 606.3,324.8 608.27,326.77 v1(604.33,326.77)
  Bottom Layer w3.94: v1(415.35,1141.73) 415.55,1141.53 P200.13@415.55,1084.65 ; v1(604.33,326.77) v1@605.31,326.77 ; v1@607.28,328.74 609.25,326.77 v1@606.3,326.77 ; P201.21@625,158.46 625,173.23 639.76,187.99 639.76,293.31 v1@606.3,326.77 ; TPJ1.1@686.06,348.44 683.09,345.47 642.72,345.47 635.83,338.58 617.13,338.58 v1@605.31,326.77 ; v1@605.31,326.77 v1@606.3,326.77
"DBG_SWO / DBG_TDO": P200.9 P200.15 P201.19 TPJ3.1 U1.28 | length 2236.4
  Top Layer w3.94: v2(275.6,722.48) 275.6,719.45 272.69,716.54 296.26,716.54 324.73,745.01 370.02,745.01 373.05,748.03 U1.28@396.26,748.03
  Signal Layer 3 w3.94: v2@267.62,722.44 v2@269.66,720.4 ; v2@267.65,722.48 v2@269.66,722.48 ; 269.66,688.01 v2@269.66,720.4 ; 269.68,687.99 269.68,646.65 253.94,630.91 253.94,579.72 156.89,482.68 156.89,338.19 215.55,279.53 262.8,279.53 291.34,250.98 430.12,250.98 448.82,269.68 487.2,269.68 544.29,326.77 v2(578.74,326.77) ; v2(275.6,722.48) v2@273.66,722.48 ; v2(464.57,1141.73) 464.57,1142.72 433.07,1174.21 376.97,1174.21 358.76,1156 358.76,1129.43 289.38,1060.05 v1(289.38,1035.48) 289.38,1030.53 226.38,967.52 226.38,841.54 264.76,803.15 264.76,764.76 278.54,750.98 278.54,727.36 v2@273.66,722.48 ; v2@269.66,720.4 v2@269.66,722.48 ; v2@269.66,720.4 270.67,719.39 270.67,719.49 v2@273.66,722.48 ; v2@269.66,722.48 269.66,725.39 v2@272.58,722.48 ; v2@269.66,722.48 v2@272.58,722.48 ; v2@272.58,722.48 272.65,722.48 v2@273.66,722.48
  Bottom Layer w3.94: v1(289.38,1035.48) 291.39,1035.48 312.99,1057.09 P200.9@312.99,1082.68 ; P200.15@463.58,1087.6 465.55,1089.57 464.57,1090.55 v2(464.57,1141.73) ; P201.19@565.55,139.76 565.55,164.96 590.55,189.96 590.55,312.99 v2@578.74,324.8 ; v2@577.76,325.79 v2@578.74,324.8 ; v2@578.25,326.28 v2(578.74,326.77) ; TPJ3.1@684.06,444.88 TPJ3.1@696.85,444.88 ; TPJ3.1@694.88,440.94 693.9,440.94 663.39,410.43 663.39,384.84 627.95,349.41 601.38,349.41 v2(578.74,326.77) ; v2@578.74,324.8 v2(578.74,326.77)
DBG_TDI: P200.8 P200.16 P201.17 TPJ4.1 U1.29 | length 3184.8
  Top Layer w3.94: v2@204.2,733.27 227.36,733.27 254.09,706.54 300.04,706.54 320.28,726.77 362.6,726.77 368.11,732.28 U1.29@396.26,732.28
  Signal Layer 3 w3.94: v2(501.01,196.85) 478.36,174.2 439.95,174.2 409.05,143.31 341.93,143.31 305.32,179.92 264.96,179.92 228.35,216.54 196.85,216.54 115.94,297.44 115.94,596.26 208.83,689.14 208.83,700.48 201.77,707.53 201.77,734.25 212.6,745.08 212.6,773.62 160.43,825.79 160.43,1146.65 v2(265.75,1251.97) 280.67,1266.89 449.65,1266.89 v2(465.55,1250.98) 515.75,1200.79 830.71,1200.79 883.86,1147.64 883.86,1118.11 920.28,1081.69 920.28,951.77 939.96,932.09 939.96,783.46 929.13,772.64 928.15,773.62 926.22,771.69 v1(924.26,771.69)
  Bottom Layer w3.94: v2(501.01,196.85) 501.01,179.11 515.55,164.57 P201.17@515.55,139.76 ; TPJ4.1@750,769.69 927.17,769.69 925.16,771.69 v1(924.26,771.69)
  Bottom Layer w19.68: P200.8@265.55,1198.82 265.55,1251.77 v2(265.75,1251.97) ; P200.16@464.57,1196.85 465.55,1197.83 v2(465.55,1250.98)
  other v2: 202.77,733.3
DEBUG_TRACED1: P200.10 P201.7 U1.30 | length 1458
  Top Layer w3.94: v2(219.5,713.62) 219.5,716.52 218.5,717.52 219.49,718.5 240.16,697.83 306.1,697.83 324.8,716.54 369.09,716.54 U1.30@396.26,716.54 U1.30@396.65,716.54
  Signal Layer 3 w3.94: v2@264.76,195.87 270.18,201.28 241.14,230.31 204.72,230.31 126.18,308.86 126.18,584.84 219.49,678.15 219.49,713.62 v2@219.49,715.55 ; v2(281.5,1140.75) 266.73,1140.75 173.23,1047.24 173.23,828.74 223.58,778.39 223.58,719.65 v2@219.49,715.55 ; v2@219.49,715.55 218.5,714.57 219.45,713.62 214.53,713.62 212.6,715.55 215.55,718.5 219.49,718.5 v2@219.49,715.55
  Bottom Layer w3.94: P201.7@265.55,139.76 264.76,140.55 273.62,149.41 v2(273.62,196.85) ; v2(281.5,1140.75) P200.10@305.12,1164.37
DEBUG_TRACED2: P200.11 P201.11 U1.31 | length 1539.4
  Top Layer w3.94: v2(243.82,680.39) 276.84,680.39 285.43,688.98 312.01,688.98 328.74,705.71 359.25,705.71 364.17,700.79 U1.31@396.26,700.79 U1.31@396.65,700.79
  Signal Layer 3 w3.94: v2@313.01,1140.76 289.37,1117.13 271.65,1117.13 187.01,1032.48 187.01,831.69 235.4,783.3 235.4,688.8 v2(243.82,680.39) 243.52,680.39 136.42,573.28 136.42,318.31 208.66,246.06 247.05,246.06 271.65,221.46 340.55,221.46 v2(365.16,196.85) ; v2@312.99,1140.78 v2(312.99,1141.73) ; v2@365.16,197.84 v2@368.13,197.84
  Bottom Layer w3.94: v2(312.99,1141.73) 333.66,1141.73 364.17,1111.22 P200.11@364.17,1094.49 ; v2(365.16,196.85) 365.16,140.16 P201.11@365.55,139.76
DEBUG_TRACED3: P200.12 P201.13 U1.32 | length 1659
  Top Layer w3.94: v2(249.02,655.54) 271.69,655.54 295.28,679.13 316.93,679.13 333.66,695.87 354.33,695.87 363.19,687.01 U1.32@394.29,687.01
  Signal Layer 3 w3.94: v2@248.03,655.51 146.65,554.13 146.65,327.76 210.63,263.78 253.94,263.78 283.46,234.25 353.35,234.25 390.2,197.4 390.64,197.84 v2@392.74,197.84 ; v2(249.02,655.54) 259.72,666.25 259.72,694.02 245.08,708.66 245.08,788.39 198.82,834.65 198.82,1017.72 283.46,1102.36 299.21,1102.36 333.66,1136.81 333.66,1219.49 v2(365.16,1250.98)
  Bottom Layer w3.94: v2(389.76,196.85) 389.76,188.98 415.55,163.19 P201.13@415.55,139.76
  Bottom Layer w19.68: v2(365.16,1250.98) 365.55,1250.59 P200.12@365.55,1198.82
DISP_ENABLE: P200.4 P200.27 U1.10 | length 1372.8
  Top Layer w3.94: U1.10@627.36,763.78 629.33,761.81 650.59,761.81 659.45,752.95 659.45,738.19 667.13,730.51 689.77,730.51 715.97,704.31 768.28,704.31 806.59,742.62 804.13,745.08 v2(804.13,748.03)
  Signal Layer 3 w3.94: v2(166.35,1259.9) 167.26,1259.9 166.83,1260.33 197.83,1291.34 607.28,1291.34 651.51,1247.11 v1(740.19,1247.11) ; v1(763.78,1026.57) 764.76,1025.59 764.76,999.02 774.61,989.17 774.61,895.67 781.5,888.78 781.5,774.69 v2@808.15,748.03 ; v2(804.13,748.03) v2@808.15,748.03 ; v2@810.12,746.06 v2@808.15,748.03
  Bottom Layer w3.94: P200.4@165.55,1198.82 165.55,1257.09 v2@167.32,1258.86 ; v1(740.19,1247.11) 737.18,1244.09 740.16,1241.12 740.16,1134.84 P200.27@753.94,1121.06 ; P200.27@754.92,1050.2 757.87,1053.15 763.78,1047.24 v1(763.78,1026.57)
DISP_EXTCOMIN: P200.31 P201.36 U1.7 | length 1369.5
  Top Layer w3.94: U1.7@627.36,716.54 629.33,714.57 646.65,714.57 658.34,702.88 658.34,692.26 679.34,671.26 706.69,671.26 729.49,648.46 956.54,648.46 v2(957.68,649.61)
  Signal Layer 3 w3.94: v2@914.41,1138.84 943.9,1109.35 943.9,986.22 967.52,962.6 967.52,659.45 v2(957.68,649.61) 957.68,633.86 971.46,620.08 971.46,396.65 965.6,390.8 v2(965.6,310.05)
  Bottom Layer w3.94: P200.31@865.55,1084.65 865.55,1108.66 897.64,1140.75 v2@913.39,1140.75 ; P201.36@965.55,253.94 P201.36@965.6,253.98
  Bottom Layer w19.68: P201.36@965.6,253.98 v2(965.6,310.05)
  other v2: 914.41,1141.73
DISP_SCLK: P200.28 P201.8 RP200.6 | length 1908.3
  Signal Layer 3 w3.94: v2(290.37,92.52) 299.22,101.38 446.85,101.38 476.38,130.91 523.62,130.91 566.93,174.21 672.24,174.21 686.02,187.99 686.02,216.54 796.26,326.77 796.26,405.51 v1(799.21,408.46) 803.15,408.46 803.15,410.43 797.24,416.34 797.24,424.21 722.44,499.02 722.44,549.21 747.05,573.82 747.05,589.2 761.53,603.68 828.09,603.68 867.13,642.72 867.13,835.63 845.47,857.28 845.47,927.17 832.68,939.96 832.68,997.05 847.44,1011.81 847.44,1065.94 791.34,1122.05 773.62,1122.05 757.38,1138.29 757.87,1138.78 v1(757.87,1140.75) 756.89,1140.75 v1@753.94,1143.7
  Bottom Layer w3.94: P201.8@265.55,253.94 265.55,230.51 290.37,205.69 v2(290.37,92.52) ; v1(757.87,1140.75) 754.92,1140.75 757.87,1143.7 757.87,1191.14 P200.28@765.55,1198.82 ; v1@799.21,415.35 RP200.6@799.21,441.93
DISP_SCS: P200.30 P201.34 U1.9 | length 1653.7
  Top Layer w3.94: U1.9@627.36,748.03 629.33,746.06 647.64,746.06 651.57,742.13 651.57,733.58 662.52,722.63 684.1,722.63 718.7,688.03 768.67,688.03 775.59,681.1 932.17,681.1 940.99,672.28 v2(940.99,667.36)
  Signal Layer 3 w3.94: v2(796.26,1262.8) 796.26,1239.17 812.01,1223.43 831.69,1223.43 898.51,1156.61 898.51,1131.02 932.09,1097.44 932.09,968.5 954.72,945.87 954.72,681.09 v2(940.99,667.36) 940.99,618.06 955.69,603.37 955.78,446.92 937.01,428.15 937.01,218.5 v2(915.35,196.85)
  Bottom Layer w3.94: v2(796.26,1262.8) 796.26,1244.09 815.55,1224.8 P200.30@815.55,1198.82 ; v2@915.35,198.82 915.55,199.02 P201.34@915.55,253.94
DISP_SI: P200.29 P201.4 RP200.8 | length 1727.7
  Signal Layer 3 w3.94: v2(190.55,92.82) 227.06,129.33 421.65,129.33 452.76,160.43 493.11,160.43 519.68,187.01 519.68,202.76 565.94,249.02 628.94,249.02 720.47,340.55 720.47,391.73 701.75,410.45 697.81,410.45 674.21,434.06 674.21,565.94 699.15,590.88 699.15,608.6 739.02,648.46 776.42,648.46 822.83,694.88 822.83,790.35 793.31,819.88 793.31,896.65 786.42,903.54 786.42,1004.92 v1@784.45,1006.89
  Bottom Layer w3.94: P201.4@165.55,253.94 165.55,229.72 190.55,204.72 190.94,204.72 190.94,93.22 v2(190.55,92.82) ; v2(702.79,410.45) 726.39,434.06 751.97,434.06 RP200.8@759.84,441.93 ; v1(782.48,1008.86) 785.43,1008.86 808.07,1031.5 P200.29@808.07,1053.15
EFR32_PA00: P200.22 P201.5 TPJ8.1 U1.25 | length 2354.4
  Top Layer w3.94: v2(195.87,762.8) 250.98,762.8 267.72,779.53 353.35,779.53 369.09,795.28 U1.25@396.26,795.28 U1.25@396.65,795.28
  Signal Layer 3 w3.94: v2(215.55,196.85) 213.58,196.85 187.99,171.26 167.32,171.26 156.5,182.09 156.5,215.55 95.47,276.57 95.47,632.87 183.07,720.47 183.07,747.05 195.9,759.88 194.43,761.36 192.99,762.8 v2(195.87,762.8) 195.87,766.73 147.64,814.96 147.64,1164.37 262.8,1279.53 587.6,1279.53 v2(615.16,1251.97) ; v1(644.68,957.68) 682.09,957.68 v1@684.06,955.71
  Bottom Layer w3.94: P201.5@215.55,139.76 207.68,147.64 221.46,161.42 215.55,167.32 v2(215.55,196.85) ; P200.22@615.55,1198.82 615.55,1173.82 631.06,1158.31 631.06,1134.68 640.75,1125 640.75,1042.32 682.09,1000.98 682.09,958.66 680.12,956.69 v1(683.07,956.69)
  Bottom Layer w19.68: TPJ8.1@615.16,960.63 618.11,957.68 v1(644.68,957.68) ; v2(615.16,1251.97) 615.16,1199.21 P200.22@615.55,1198.82
EFR32_PA08: P200.19 P201.12 TPJ5.1 U1.33 | length 1956
  Top Layer w3.94: v2(339.57,679.13) 339.57,684.06 346.46,677.17 373.03,677.17 379.92,670.28 395.28,670.28 U1.33@396.26,669.29 U1.33@396.65,669.29
  Signal Layer 3 w3.94: v2(366.14,324.8) 347.44,324.8 288.39,383.86 218.5,383.86 197.83,404.53 197.83,438.98 319.72,560.87 319.72,653.53 329.04,662.85 329.04,668.61 v2(339.57,679.13) 339.57,747.05 305.12,781.5 305.12,852.36 278.54,878.94 278.54,942.91 354.33,1018.7 354.33,1058.07 397.97,1101.71 562.34,1101.71 587.6,1126.97 v2(587.6,1141.73) ; v1(640.78,1008.89) 639.76,1007.87 650.59,997.05 713.58,997.05 729.41,981.22 v1(729.41,944.88)
  Bottom Layer w3.94: P201.12@365.55,253.94 366.14,254.53 v2(366.14,324.8) ; v2(587.6,1141.73) 587.6,1133.86 565.55,1111.81 P200.19@565.55,1084.65 565.55,1059.14 586.31,1038.39 613.19,1038.39 v1@640.75,1010.83 ; TPJ5.1@612.2,775.59 654.53,775.59 677.17,798.23 677.17,859.25 729.41,911.5 v1(729.41,944.88) ; v1(640.78,1008.89) v1@640.78,1010.83
EFR32_PA09: P200.20 P201.14 TPJ6.1 U1.34 | length 2287.7
  Top Layer w3.94: v2@307.09,662.4 351.38,662.4 358.27,655.51 394.29,655.51 U1.34@396.26,653.54
  Signal Layer 3 w3.94: v2(415.35,306.1) 340.55,306.1 278.54,368.11 213.58,368.11 187.6,394.09 187.6,449.41 309.06,570.87 309.06,655.51 305.12,659.45 306.1,660.43 v2(306.1,662.4) 306.1,668.16 326.77,688.83 326.77,746.06 295.28,777.56 295.28,848.43 266.73,876.97 266.73,947.83 339.57,1020.67 339.57,1061.02 391.4,1112.86 551.84,1112.86 562.99,1124.02 v2(562.99,1141.73) ; v2@561.02,1140.75 591.54,1171.26 804.13,1171.26 819.88,1155.51 819.88,1139.76 875,1084.65 875,950.79 907.48,918.31 v1(907.48,890.75)
  Bottom Layer w3.94: v2(562.99,1141.73) P200.20@562.99,1188.33 ; P200.20@563.02,1188.36 559.06,1192.32 P200.20@565.55,1198.82 ; v1@910.43,887.8 v1(907.48,890.75) 830.71,890.75 808.86,868.9 TPJ6.1@760.04,868.9 ; TPJ6.1@760.04,868.9 754.43,874.51 TPJ6.1@748.82,868.9 TPJ6.1@760.04,868.9
  Bottom Layer w19.68: v2(415.35,306.1) 415.55,305.91 P201.14@415.55,253.94
EFR32_PA10: P200.21 P201.3 TPJ7.1 U1.35 | length 1957.5
  Top Layer w3.94: v2(190.94,695.87) v2@194.04,695.87 ; v2@196.01,697.83 v2@194.04,695.87 ; U1.35@396.65,637.8 U1.35@396.26,637.8 394.29,639.76 374.6,639.76 368.7,645.67 v2(335.63,645.67) 335.63,649.36 331.94,645.67 274.07,645.67 264.26,635.86 239.14,635.86 224.41,650.59 224.41,678.47 207.01,695.87 v2@194.04,695.87
  Signal Layer 3 w3.94: v2(174.21,196.85) 174.21,219.49 105.71,287.99 105.71,610.63 v2(190.94,695.87) ; v2(335.63,645.67) 335.63,649.61 356.3,670.28 356.3,745.08 314.96,786.42 314.96,855.31 292.32,877.95 292.32,939.96 368.11,1015.75 368.11,1053.15 405.51,1090.55 582.68,1090.55 615.16,1123.03 v2(615.16,1141.73) ; v2(190.94,695.87) 190.94,699.8 188.98,697.83 v2(190.94,695.87)
  Bottom Layer w3.94: P201.3@165.55,139.76 173.23,147.44 173.23,191.93 v2@169.29,195.87 ; P200.21@607.28,1111.22 615.16,1119.09 v2(615.16,1141.73) ; P200.21@615.55,1084.65 615.55,1059.48 627.95,1047.08 627.95,1043.98 664.37,1007.57 664.37,946.85 629.92,912.4 629.92,886.61 TPJ7.1@649.21,867.32
EFR32_PB00: P200.18 P201.18 U1.24 | length 1732.8
  Top Layer w3.94: v2(265.75,853.35) 298.23,820.87 341.54,820.87 353.35,809.06 421.26,809.06 U1.24@423.23,811.02 ; U1.24@425.2,824.21 U1.24@425.2,835.63
  Signal Layer 3 w3.94: v1(493.11,319.88) 471.46,298.23 435.04,298.23 418.31,281.5 343.5,281.5 274.61,350.39 210.63,350.39 177.36,383.66 177.36,460.83 277.56,561.02 277.56,613.19 289.37,625 289.37,678.15 313.98,702.76 313.98,745.08 284.45,774.61 284.45,834.65 v2(265.75,853.35) 252.95,866.14 252.95,951.77 324.8,1023.62 324.8,1062.99 385.83,1124.02 499.38,1124.02 ; 499.38,1124.02 511.81,1136.44 508.86,1139.4 511.19,1141.73 v2(513.78,1141.73)
  Bottom Layer w3.94: v1(493.11,319.88) 502.95,310.04 502.95,287.4 515.55,274.8 P201.18@515.55,253.94 P201.18@515.55,231.1 ; v2(513.78,1141.73) 513.78,1182.09 508.86,1187.01 P200.18@513.78,1191.93
EFR32_PB01: P200.25 P201.20 U1.23 | length 1941
  Top Layer w3.94: v1@405.91,847.05 431.97,847.05 U1.23@438.98,840.04 ; U1.23@440.95,824.21 U1.23@440.94,838.58
  Signal Layer 3 w3.94: v1@408.46,849.41 408.46,869.86 384.84,893.48 384.84,927.17 368.11,943.9 368.11,972.44 406.5,1010.83 406.5,1037.4 426.18,1057.09 619.09,1057.09 666.5,1009.69 693.74,1009.69 v2(712.6,1028.54) 712.6,1031.13 742.49,1061.02 790.35,1061.02 808.07,1043.31 808.07,1028.54 799.21,1019.68 799.21,911.42 806.1,904.53 806.1,829.72 833.66,802.17 833.66,682.09 789.37,637.8 746.06,637.8 711.12,602.85 711.12,586.12 686.02,561.02 686.02,442.91 700.8,428.14 734.27,428.14 751.97,410.43 751.97,337.6 633.86,219.49 595.47,219.49 v2(572.83,196.85) ; v2(572.83,196.85) 569.88,193.9 566.93,196.85 v2(572.83,196.85)
  Bottom Layer w3.94: P200.25@711.61,1081.69 P200.25@712.6,1080.71
  Bottom Layer w15.75: v2@571.46,196.85 P201.20@571.46,245.08
  Bottom Layer w19.68: v2(712.6,1028.54) P200.25@712.6,1080.71
  other v1: 404.53,843.5
EFR32_PB02: P200.23 P201.22 U1.22 | length 1954.9
  Top Layer w3.94: v1(389.76,862.2) 415.35,862.2 422.64,854.92 441.34,854.92 U1.22@456.69,839.57
  Signal Layer 3 w3.94: v1@389.76,864.54 349.41,904.89 349.41,968.5 393.7,1012.8 393.7,1040.35 421.26,1067.91 635.83,1067.91 675.2,1028.54 v2(678.15,1028.54) 681.1,1028.54 731.3,1078.74 794.29,1078.74 820.87,1052.17 820.87,1023.62 811.02,1013.78 811.02,919.29 818.9,911.42 818.9,839.57 844.49,813.98 844.49,668.31 802.17,625.98 751.97,625.98 723.1,597.11 723.1,582.35 698.82,558.07 698.82,449.8 708.66,439.96 742.13,439.96 766.73,415.35 766.73,335.63 633.86,202.76 622.05,202.76 v2(616.14,196.85)
  Bottom Layer w3.94: P200.23@671.26,1061.02 P200.23@677.17,1066.93
  Bottom Layer w15.75: P200.23@671.26,1061.02 671.26,1035.43 v2(678.15,1028.54)
  Bottom Layer w19.68: P201.22@615.55,253.94 616.14,253.35 v2(616.14,196.85)